# Altium PCB CM5_RP2040_MZM.PcbDoc (part 4 of 5)
Units mil, origin at the board's own origin, x right, y up, seen from the top; angles counter-clockwise.
Board outline 4724.41 x 3543.31 mil, 4 copper layers (Top Layer, GND L2, GND L3, Bottom Layer), stack 62.992 mil thick; 227 components, 122 nets, 905 pads, 3083 vias.
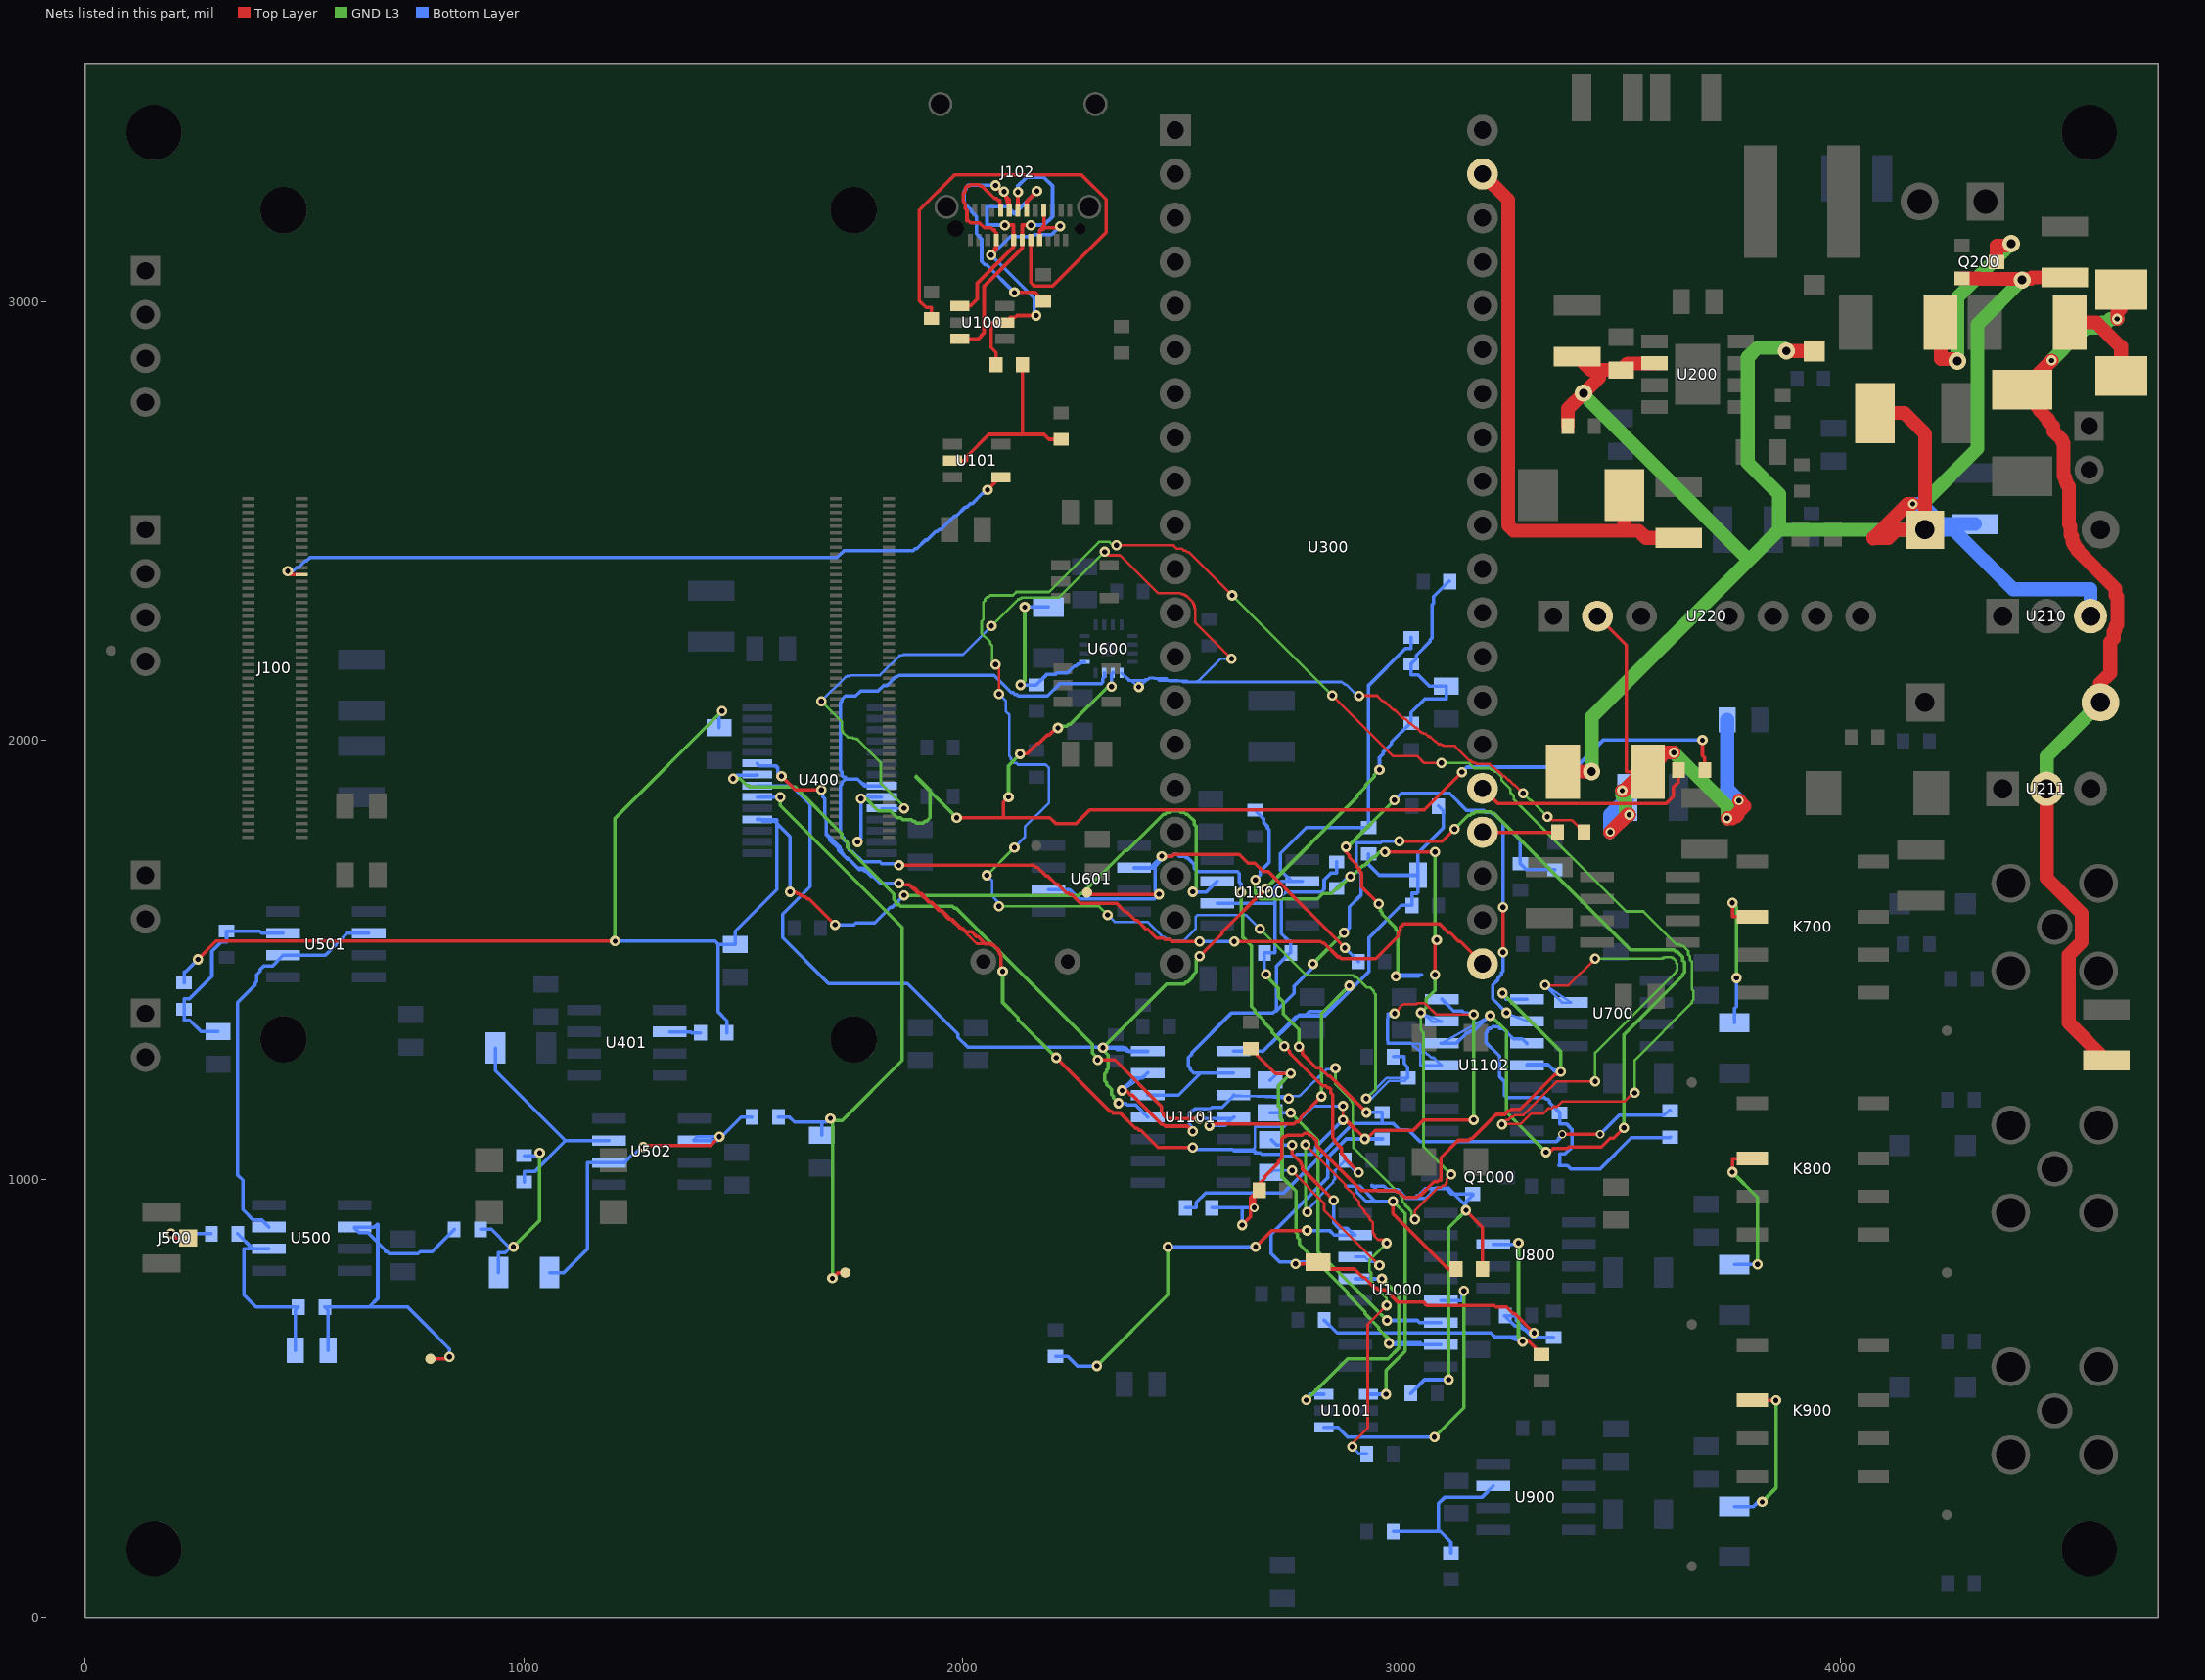
[diagram p6: the nets of this part, all layers, seen from the top]

## Via types
v1: diameter 23.62, hole 11.81, Top Layer to Bottom Layer, tented both sides, 3043 vias
v2: diameter 39.37, hole 19.68, Top Layer to Bottom Layer, tented both sides, 22 vias
v3: diameter 19.68, hole 11.81, Top Layer to Bottom Layer, tented both sides, 14 vias
v4: diameter 21.65, hole 11.81, Top Layer to Bottom Layer, tented both sides, 4 vias

## Nets (pads, with @x,y where several pads share a name; then routed paths per layer and width w, separated by ;. In a path a pad name is that pad's centre, name@x,y a point inside that pad or via, vN(x,y) a via of type N, cw(c..) or ccw(c..) an arc to the next point about the centre after c; other vN are vias at no path point) (continued)
MON_I: C1110.1 R1110.2 R1111.2 R1112.1 U400.7 U1101.4 U1101.7 | length 3396.3
  Top Layer w7.87: v1(2540.35,1508.27) 2591.54,1559.45 2591.54,1563.39 v1(2689.96,1661.81)
  GND L3 w7.87: v1@2319.88,1299.21 2319.88,1295.28 2331.69,1283.46 2331.69,1251.97 2327.76,1248.03 2327.76,1244.09 2323.82,1240.16 2323.82,1224.41 2327.76,1220.47 2327.76,1216.54 2339.57,1204.72 2339.57,1192.91 2343.5,1188.98 2343.5,1185.04 v1(2355.31,1173.23) ; v1(2319.88,1299.61) 2465.55,1445.28 2504.92,1445.28 2508.86,1449.21 2512.8,1449.21 2524.61,1461.02 2524.61,1464.96 2532.48,1472.83 2532.48,1500.39 v1(2540.35,1508.27) ; v1(2689.96,1661.81) 2898.62,1870.47 2898.62,1874.41 2918.31,1894.09 2918.31,1898.03 2937.99,1917.72 2937.99,1921.65 v1(2949.8,1933.46)
  Bottom Layer w7.87: U400.7@1532.17,1896.65 1610.41,1896.65 1652.33,1854.74 1652.33,1666.35 1590.09,1604.11 1590.09,1550.54 1694.38,1446.24 1874.42,1446.24 1989.45,1331.21 1989.45,1323.57 2012.46,1300.56 2365.12,1300.56 2373.95,1291.73 U1101.7@2422.24,1291.73 ; v1@2319.88,1299.21 2347.44,1299.21 2351.38,1295.28 2375,1295.28 2378.94,1291.34 2422.24,1291.34 U1101.7@2422.24,1291.73 ; v1(2319.88,1299.61) 2371.06,1299.61 2378.94,1291.73 U1101.7@2422.24,1291.73 ; v1(2355.31,1173.23) 2371.06,1173.23 2375,1169.29 2394.68,1169.29 U1101.4@2422.24,1141.73 ; v1(2949.8,1933.46) 2949.8,1961.02 2957.68,1968.9 2957.68,1972.83 2977.36,1992.52 2977.36,1996.46 3020.67,2039.76 R1112.1@3022.05,2038.98 3022.05,2063.65 3052.82,2094.42 3101.97,2094.42 C1110.1@3101.97,2124.02 3063.52,2124.02 3037.6,2149.93 3022.05,2149.93 R1111.2@3022.05,2174.61 3033.86,2186.42 3033.86,2194.29 3065.35,2225.79 3065.35,2229.72 3069.29,2233.66 3069.29,2308.46 3073.23,2312.4 3073.23,2328.15 3108.66,2363.58 R1110.2@3109.65,2362.2
MON_PHI: C1112.1 R1118.2 R1119.2 R1120.1 U400.9 U1102.4 U1102.7 | length 6342.4
  Top Layer w5.91: v1(1587.28,1918.7) 1618.78,1887.2 v1(1677.83,1887.2) ; v1(1855,1674.61) 1858.94,1670.67 1878.62,1670.67 1898.31,1650.98 1902.24,1650.98 1921.93,1631.3 1925.87,1631.3 1945.55,1611.61 1949.49,1611.61 1969.17,1591.93 1973.11,1591.93 1992.8,1572.24 1996.73,1572.24 2032.17,1536.81 2067.6,1536.81 2079.41,1525 2079.41,1521.06 2083.35,1517.13 2083.35,1513.19 2087.28,1509.25 2087.28,1477.76 v1(2091.22,1473.82) ; v1(2866.81,1166.73) 2866.81,1143.11 v1@2917.99,1091.93 ; v1@2985.24,1377.36 2993.11,1385.24 2993.11,1387.2 2995.08,1389.17 2995.08,1391.14 3000.98,1397.05 3002.95,1397.05 3004.92,1399.02 3034.45,1399.02 3036.42,1400.98 3052.17,1400.98 3054.13,1399.02 3056.1,1399.02 3079.72,1375.39 v1@3164.37,1375.39
  Top Layer w7.87: v1(1587.28,1918.7) 1618.78,1887.2 v1(1677.83,1887.2) ; v1(1855,1674.61) 1858.94,1670.67 1878.62,1670.67 1886.5,1662.8 1890.43,1662.8 1902.24,1650.98 1906.18,1650.98 1925.87,1631.3 1929.8,1631.3 1949.49,1611.61 1953.43,1611.61 1973.11,1591.93 1977.05,1591.93 1996.73,1572.24 2000.67,1572.24 2008.54,1564.37 2020.35,1564.37 2032.17,1552.56 2036.1,1552.56 2051.85,1536.81 2063.66,1536.81 2067.6,1532.87 2071.54,1532.87 2083.35,1521.06 2083.35,1517.13 2087.28,1513.19 2087.28,1477.76 v1(2091.22,1473.82) ; v1(2213.27,1276.97) 2335.31,1154.92 2339.25,1154.92 2343.19,1150.98 2358.94,1150.98 2394.37,1115.55 2398.31,1115.55 2402.24,1111.61 2406.18,1111.61 2445.55,1072.24 v1(2524.29,1072.24) ; C1112.1@2809.84,811.02 2805.91,807.09 v1(2758.66,807.09) 2794.09,807.09 2801.97,799.21 2809.84,799.21 2813.78,795.28 2892.52,795.28 2912.2,775.59 2916.14,775.59 2939.76,751.97 2943.7,751.97 2947.64,748.03 2963.39,748.03 2990.94,720.47 3050,720.47 3057.87,712.6 3211.42,712.6 3215.35,708.66 3238.98,708.66 3254.72,692.91 3258.66,692.91 v1(3301.97,649.61) ; v1(2866.81,1135.24) 2870.75,1131.3 2874.68,1131.3 2894.37,1111.61 2898.31,1111.61 v1@2917.99,1091.93 ; v1(2916.54,1091.93) 2920.47,1095.87 2924.41,1095.87 2940.16,1111.61 3026.77,1111.61 3050.39,1135.24 v1(3164.57,1135.24)
  GND L3 w5.91: v1@3164.37,1375.39 3164.37,1255.31 3164.57,1255.31
  GND L3 w7.87: v1(2091.22,1473.82) 2091.22,1402.95 2126.65,1367.52 2126.65,1363.58 v1(2213.27,1276.97) ; v1(3164.57,1135.24) v1(3164.57,1375.39) v1@3166.34,1375.39
  Bottom Layer w5.91: U400.9@1532.17,1947.83 1532.17,1946.26 1536.1,1942.32 1575.47,1942.32 1575.47,1938.39 1579.41,1934.45 1579.41,1926.57 v1(1587.28,1918.7) ; v1(1677.83,1887.2) 1677.83,1879.33 1681.77,1875.39 1681.77,1871.46 1685.71,1867.52 1685.71,1824.21 1689.65,1820.28 1689.65,1788.78 1721.14,1757.28 1721.14,1753.35 1725.08,1749.41 1725.08,1745.47 1729.02,1741.54 1729.02,1737.6 1732.95,1733.66 1736.89,1733.66 1760.51,1710.04 1776.26,1710.04 1795.94,1690.35 1799.88,1690.35 1815.63,1674.61 v1(1855,1674.61) ; v1(2524.29,1072.24) 2528.23,1072.24 2532.17,1068.31 2662.09,1068.31 2666.02,1072.24 2666.02,1119.49 2732.95,1119.49 2740.83,1127.36 2756.57,1127.36 2760.51,1131.3 2764.45,1131.3 2799.88,1166.73 v1(2866.81,1166.73) ; v1@2917.99,1091.93 2957.36,1091.93 R1119.2@2955.91,1091.93 ; v1(2984.25,1377.95) 2968.7,1377.95 2968.7,1309.06 3043.31,1309.06 3043.31,1259.84 U1102.4@3091.54,1259.84 3091.54,1259.25 3073.82,1276.97 3067.91,1276.97 3060.04,1284.84 3058.07,1284.84 3054.13,1288.78 3044.29,1288.78 3032.48,1300.59 3030.51,1300.59 3020.67,1310.43 2973.43,1310.43 2967.52,1316.34 2967.52,1365.55 2973.43,1371.46 2979.33,1371.46 v1@2985.24,1377.36
  Bottom Layer w7.87: U400.9@1532.17,1947.83 1532.17,1946.26 1536.1,1942.32 1575.47,1942.32 1575.47,1938.39 1579.41,1938.39 1579.41,1926.57 v1(1587.28,1918.7) ; v1(1677.83,1887.2) 1677.83,1879.33 1681.77,1875.39 1681.77,1871.46 1685.71,1867.52 1685.71,1824.21 1689.65,1820.28 1689.65,1784.84 1697.52,1776.97 1697.52,1773.03 1717.2,1753.35 1717.2,1749.41 1736.89,1729.72 1740.83,1729.72 1764.45,1706.1 1772.32,1706.1 1776.26,1702.17 1780.2,1702.17 1792.01,1690.35 1795.94,1690.35 1811.69,1674.61 v1(1855,1674.61) ; v1(2524.29,1072.24) 2528.23,1072.24 2532.17,1068.31 2614.84,1068.31 2618.78,1064.37 2666.02,1064.37 2666.02,1060.43 2677.83,1060.43 2681.77,1056.5 2725.08,1056.5 2729.02,1052.56 2756.57,1052.56 2760.51,1056.5 2795.94,1056.5 2795.94,1060.43 2799.88,1060.43 2799.88,1064.37 2803.82,1064.37 2803.82,1072.24 v1(2866.81,1135.24) ; v1(2916.54,1091.93) R1119.2@2955.91,1091.93 ; v1@2917.99,1091.93 2957.36,1091.93 R1119.2@2955.91,1091.93 ; U1102.7@3091.54,1409.84 3091.54,1410.83 3119.09,1383.27 3138.78,1383.27 3142.72,1379.33 3150.59,1379.33 3154.53,1375.39 v1@3166.34,1375.39 ; v1(3301.97,649.61) 3290.16,649.61 3282.28,657.48 3278.35,657.48 3274.41,661.42 3270.47,661.42 3266.54,665.35 3258.66,665.35 3235.04,688.98 R1120.1@3236.42,688.98 3261.09,688.98 3261.09,678.04 3299.96,639.17 R1118.2@3346.46,639.17 ; 2809.84,811.02 2722.56,811.02 2702.34,831.24 2702.34,873.8 2831.73,1003.18 2831.73,1049.68 2873.98,1091.93 2928.28,1091.93 R1119.2@2955.91,1091.93 ; 2809.84,811.02 2766.54,811.02 2762.6,807.09 v1(2758.66,807.09) 2809.84,811.02
MON_Q: C1111.1 R1114.2 R1115.2 R1116.1 U400.8 U1101.8 U1101.11 | length 3652.2
  Top Layer w7.87: v1(2307.76,1271.65) 2347.13,1271.65 2453.43,1165.35 2453.43,1153.54 2457.36,1149.61 2457.36,1145.67 2461.3,1141.73 2465.24,1141.73 2469.17,1137.8 v1(2540.04,1137.8) ; v1(2562.01,1122.05) 2565.94,1125.98 2754.92,1125.98 ; 2660.43,1125.98 2754.92,1125.98 ; 2754.92,1125.98 2758.86,1129.92 ; 2754.92,1125.98 2758.86,1129.92 ; 2758.86,1129.92 2762.8,1129.92 ; 2758.86,1129.92 2762.8,1129.92 ; 2762.8,1129.92 2770.67,1137.8 ; 2762.8,1129.92 2770.67,1137.8 ; 2770.67,1137.8 2770.67,1141.73 ; 2770.67,1137.8 2770.67,1141.73 ; 2770.67,1141.73 v1(2817.91,1188.98) 2770.67,1141.73
  GND L3 w7.87: v1(1477.05,1913.39) 1492.8,1913.39 1508.54,1897.64 1512.48,1897.64 1516.42,1893.7 1618.78,1893.7 1725.08,1787.4 1725.08,1779.53 1736.89,1767.72 1736.89,1755.91 1843.19,1649.61 1843.19,1637.8 1847.13,1633.86 1847.13,1629.92 1851.06,1625.98 1855,1625.98 1858.94,1622.05 1977.05,1622.05 1980.98,1618.11 1984.92,1618.11 2295.94,1307.09 2295.94,1287.4 2307.76,1275.59 v1(2307.76,1271.65) ; v1(2817.91,1188.98) 2817.91,1377.95 v1(2880.91,1440.94)
  Bottom Layer w7.87: v1(1477.05,1913.39) 1484.92,1921.26 1532.17,1921.26 U400.8@1532.17,1922.24 ; v1(2540.04,1137.8) 2614.84,1137.8 2618.78,1141.73 U1101.11@2617.13,1141.73 2597.44,1122.05 v1(2562.01,1122.05) ; U1101.8@2617.13,1291.73 2683.87,1291.73 ; v1(2880.91,1440.94) 2853.35,1413.39 2853.35,1405.51 2829.72,1381.89 2790.35,1381.89 2782.48,1374.02 2766.73,1374.02 2762.8,1370.08 2758.86,1370.08 2715.55,1326.77 2715.55,1322.83 2684.06,1291.34 2683.87,1291.73 ; R1115.2@2925.2,1741.54 2925.2,1716.86 2949.15,1692.91 C1111.1@3037.8,1692.91 ; R1114.2@3084.45,1850.39 3095.19,1839.65 3095.19,1800.95 3037.8,1743.56 C1111.1@3037.8,1692.91 ; 2683.87,1291.73 2765.04,1372.91 2825.17,1372.91 2926.37,1474.11 2926.37,1550.85 2999.54,1624.02 R1116.1@3024.21,1624.02 3024.21,1651.64 3034.98,1651.64 3037.8,1654.46 C1111.1@3037.8,1692.91
N15_FUSED: D202.1 F201.2 | length 207.1
  Top Layer w31.5: F201.2@4522.44,2952.76 4582.74,2952.76 4637.8,2897.7 4639.76,2897.7 D202.1@4639.76,2830.71
NONINV_I: R702.2 R703.1 U700.3 | length 6293.3
  Top Layer w5.91: v1(2074.8,2173.23) 2082.68,2165.35 v1(2082.68,2106.3) ; v1(2350.39,2444.88) 2480.31,2444.88 2488.19,2437.01 2500,2437.01 2503.94,2433.07 2507.87,2433.07 2511.81,2429.13 2515.75,2429.13 v1(2614.17,2330.71) ; v1(2842.52,2102.36) 2980.31,1964.57 3035.43,1964.57 3051.18,1948.82 v1(3090.55,1948.82) ; v1@3327.17,1441.54 3380.31,1441.54 v1(3441.34,1502.56) ; v1(3441.34,1223.03) 3354.72,1223.03 3277.95,1146.26 3258.27,1146.26 3254.33,1142.32 3250.39,1142.32 3242.52,1134.45 3238.58,1134.45 v1(3228.74,1124.61) 3228.35,1125.98 3271.65,1125.98 3295.28,1149.61 3322.83,1149.61 3334.65,1161.42 3342.52,1161.42 3346.46,1165.35 3354.33,1165.35 3366.14,1177.17 3507.87,1177.17 3527.56,1196.85 v1(3531.5,1196.85)
  GND L3 w5.91: v1(2055.12,1692.91) v1(2118.11,1755.91) ; v1(2074.8,2173.23) 2066.93,2181.1 2066.93,2216.54 2062.99,2220.47 2062.99,2224.41 2043.31,2244.09 2043.31,2271.65 2047.24,2275.59 2047.24,2314.96 2051.18,2318.9 2051.18,2322.83 2055.12,2326.77 2059.06,2326.77 2062.99,2330.71 2114.17,2330.71 2122.05,2338.58 2196.85,2338.58 2311.02,2452.76 2334.65,2452.76 2342.52,2444.88 v1(2350.39,2444.88) ; v1(2082.68,1622.05) 2311.02,1622.05 v1(2330.71,1602.36) ; v1(2614.17,2330.71) v1(2842.52,2102.36) ; v1(2677.17,1570.87) 2783.46,1464.57 2889.76,1464.57 2893.7,1460.63 2897.64,1460.63 2921.26,1437.01 2929.13,1437.01 2937.01,1429.13 2937.01,1425.2 2940.94,1421.26 2940.94,1204.72 v1@2921.26,1185.04 ; v1(3090.55,1948.82) 3153.54,1948.82 3165.35,1937.01 3200.79,1937.01 3204.72,1933.07 3208.66,1933.07 3212.6,1929.13 3216.54,1929.13 3228.35,1917.32 3228.35,1909.45 3248.03,1889.76 3248.03,1881.89 3255.91,1874.02 3255.91,1866.14 3511.81,1610.24 3551.18,1610.24 3625.98,1535.43 3633.86,1535.43 3637.8,1531.5 3641.73,1531.5 3653.54,1519.68 3653.54,1511.81 3657.48,1507.87 3657.48,1500 3661.42,1496.06 3661.42,1433.07 3665.35,1429.13 3665.35,1409.45 3661.42,1405.51 3661.42,1401.57 3531.5,1271.65 v1(3531.5,1196.85) ; v1(3441.34,1223.03) 3441.34,1287.99 3626.38,1473.03 3626.38,1475 3628.35,1476.97 3628.35,1490.75 3626.38,1492.72 3626.38,1496.65 3618.5,1504.53 3616.54,1504.53 3614.57,1506.5 3600.79,1506.5 3598.82,1504.53 3594.88,1504.53 3592.91,1502.56 v1(3441.34,1502.56)
  Bottom Layer w5.91: v1(2055.12,1692.91) 2066.93,1681.1 2066.93,1645.67 2082.68,1629.92 v1(2082.68,1622.05) ; v1(2082.68,2106.3) 2098.43,2090.55 2098.43,2066.93 2106.3,2059.06 2106.3,1964.57 2110.24,1960.63 2110.24,1956.69 2118.11,1948.82 2122.05,1948.82 2125.98,1944.88 2188.98,1944.88 2196.85,1937.01 2196.85,1858.27 2141.73,1803.15 2141.73,1779.53 v1(2118.11,1755.91) ; v1(2330.71,1602.36) 2346.46,1586.61 2421.26,1586.61 2456.69,1551.18 2460.63,1551.18 2464.57,1547.24 2472.44,1547.24 2476.38,1543.31 2503.94,1543.31 2531.5,1570.87 2531.5,1598.43 2535.43,1602.36 2645.67,1602.36 v1(2677.17,1570.87) ; v1(2919.68,1183.66) 2966.93,1230.91 R703.1@3014.17,1230.91 3015.75,1232.28 3007.87,1224.41 2972.44,1224.41 2933.07,1185.04 v1@2921.26,1185.04 ; v1(3326.97,1442.32) U700.3@3386.02,1402.95 3386.22,1402.17 3366.54,1402.17 v1@3327.17,1441.54
  Bottom Layer w7.87: R702.2@2981.3,1279.53 3005.97,1279.53 3005.97,1263.78 3014.17,1255.58 R703.1@3014.17,1230.91
NONINV_PHI: R902.2 R903.1 U900.3 | length 371.1
  Bottom Layer w7.87: R902.2@2981.3,196.85 3083.78,196.85 ; R903.1@3112.6,148.23 3112.6,172.9 3088.65,196.85 3083.78,196.85 ; U900.3@3208.86,300.59 3183.86,275.59 3099.11,275.59 3083.78,260.27 3083.78,196.85
NONINV_Q: R802.2 R803.1 U800.3 | length 854.4
  Top Layer w7.87: v1(3276.17,630.13) 3290.14,630.13 R803.1@3319.29,600.98
  GND L3 w7.87: v1(3266.47,855.23) 3266.47,639.83 v1(3276.17,630.13)
  Bottom Layer w7.87: R802.2@2823.82,679.13 2853.35,649.61 3203.67,649.61 3212.93,640.35 3240.55,640.35 ; U800.3@3208.86,851.77 3257.15,851.77 3260.61,855.23 v1(3266.47,855.23) ; 3240.55,640.35 3268.18,640.35 3268.18,638.13 v1(3276.17,630.13) 3240.55,640.35
P15_FUSED: F200.2 Q200.3 | length 514.5
  Top Layer w31.5: F200.2@4228.54,2952.76 4228.54,2869.03 4262.37,2869.03 v2(4266.73,2864.67) ; Q200.3@4355.91,3090.55 4355.91,3128.02 4384.99,3128.02 v2(4389.21,3132.24)
  GND L3 w31.5: v2(4266.73,2864.67) 4266.73,3009.76 v2(4389.21,3132.24)
PD_K: C500.1 R500.1 R506.2 U500.2 | length 484.2
  Bottom Layer w7.87: R506.2@348.23,875.98 383.07,841.14 U500.2@419.09,841.14 362.2,841.14 362.2,736.22 389.76,708.66 R500.1@486.42,708.66 479.13,701.38 C500.1@479.13,610.24
PD_RAW: J500.1 R506.1 | length 135.6
  Top Layer w7.87: v1(196.16,875.98) 196.16,874.24 204.26,866.14 J500.1@234.84,866.14
  Bottom Layer w7.87: v1(196.16,875.98) R506.1@287.99,875.98
PHOTO_ADC: C507.1 R505.2 TP501.1 U400.6 | length 1540.1
  Top Layer w7.87: v1(1703.31,774.26) 1716.46,787.4 TP501.1@1732.28,787.4
  GND L3 w7.87: v1(1584.56,1871.06) 1584.56,1851.54 1862.14,1573.96 1862.14,1270.62 1725.56,1134.04 v1@1703.31,1134.04 ; v1(1698.74,1138.61) v1@1703.31,1134.04 ; v1(1703.31,774.26) v1@1703.31,1134.04
  Bottom Layer w7.87: U400.6@1532.17,1871.06 v1(1584.56,1871.06) ; R505.2@1580.53,1141.73 1605.2,1141.73 1616.95,1129.99 1678.74,1129.99 ; C507.1@1678.74,1100.39 1678.74,1129.99 ; v1(1698.74,1138.61) 1690.13,1129.99 1678.74,1129.99
PICO_VSYS: C300.1 D300.1 U300.39 | length 1306.1
  Top Layer w31.5: U300.39@3184.65,3290.94 3242.96,3232.63 3242.96,2490.82 3255.5,2478.28 3507.97,2478.28 ; D300.1@3507.97,2559.05 3507.97,2478.28 ; C300.1@3631.89,2461.61 3557.02,2461.61 3540.35,2478.28 3507.97,2478.28
RAIL_NEG: R1008.2 R1009.2 U1102.10 | length 876.2
  Bottom Layer w7.87: U1102.10@3286.42,1309.84 3286.42,1308.46 3274.61,1320.28 3254.92,1320.28 3231.3,1343.9 3223.43,1343.9 3223.43,1347.83 3207.68,1347.83 3203.74,1343.9 3199.8,1343.9 3195.87,1339.96 3195.87,1336.02 3191.93,1332.09 3191.93,1312.4 3223.43,1280.91 3223.43,1233.66 3235.24,1221.85 3235.24,1190.35 3239.17,1186.42 3325.79,1186.42 3329.72,1182.48 3333.66,1182.48 3337.6,1178.54 3337.6,1174.61 3361.22,1150.98 R1008.2@3360.24,1150.98 3360.24,1126.31 3375.66,1126.31 3389.09,1112.87 3389.09,1074.07 3372.57,1057.55 3360.24,1057.55 3360.24,1032.87 3358.27,1031.5 3377.95,1031.5 3385.83,1023.62 3452.76,1023.62 3523.62,1094.49 3610.24,1094.49 R1009.2@3612.2,1095.87
RAIL_POS: R1006.2 R1007.1 U1102.9 | length 1605.9
  Top Layer w7.87: v1(2873.3,1757.48) 2873.3,1745.67 2881.17,1737.8 2881.17,1733.86 2896.92,1718.11 2896.92,1714.17 2904.79,1706.3 2904.79,1702.36 2908.73,1698.43 2908.73,1666.93 v1(2948.1,1627.56) ; v1(3231.56,1517.32) v1(3231.56,1619.68)
  GND L3 w7.87: v1(2873.3,1757.48) 2877.23,1757.48 v1(2983.53,1863.78) ; v1(2948.1,1627.56) 2948.1,1619.68 2952.04,1615.75 2952.04,1611.81 2955.97,1607.87 2955.97,1603.94 2987.47,1572.44 2987.47,1568.5 2991.41,1564.57 2991.41,1466.14 v1(2987.47,1462.2)
  Bottom Layer w5.91: v1(3239.17,1379.53) U1102.9@3286.42,1359.84
  Bottom Layer w7.87: v1(2983.53,1863.78) 2999.28,1879.53 3109.52,1879.53 3148.89,1840.16 3188.26,1840.16 3192.19,1836.22 3204,1836.22 3207.94,1832.28 3211.88,1832.28 3231.56,1812.6 ; v1(2987.47,1462.2) 3038.65,1462.2 3042.59,1466.14 3046.52,1466.14 3046.52,1465.94 3018.9,1465.94 2991.27,1465.94 2991.27,1464.17 v1@2988.39,1461.29 ; v1(3231.56,1517.32) 3231.56,1474.02 3227.63,1470.08 3227.63,1466.14 3219.75,1458.27 3219.75,1454.33 3207.94,1442.52 3207.94,1411.02 3239.44,1379.53 v1(3239.17,1379.53) ; v1(3231.56,1619.68) 3231.56,1812.6 ; R1006.2@3349.61,1705.31 3284.65,1705.31 R1007.1@3270.87,1719.09 3270.87,1773.3 3231.56,1812.6
REF_ADC: C400.1 C401.1 R400.2 R501.1 U400.4 U1100.3 | length 4075.8
  Top Layer w7.87: v1(257.44,1501.2) 298.8,1542.56 v1(1208.03,1542.56) ; v1(1606.97,1654.92) 1618.78,1654.92 1622.72,1650.98 1626.65,1650.98 1630.59,1647.05 1634.53,1647.05 1638.46,1643.11 1642.4,1643.11 1646.34,1639.17 1650.28,1639.17 v1(1709.33,1580.12)
  GND L3 w7.87: v1(1208.03,1542.56) 1208.03,1822.98 v1(1452.11,2067.06) ; v1(1866.81,1647.05) 2264.45,1647.05 2268.39,1650.98 2272.32,1650.98 2370.75,1749.41 2374.68,1749.41 2457.36,1832.09 2461.3,1832.09 2465.24,1836.02 2473.11,1836.02 2477.05,1839.96 2492.8,1839.96 2496.73,1836.02 2504.61,1836.02 2508.54,1832.09 2512.48,1832.09 2528.23,1816.34 2528.23,1808.46 2532.17,1804.53 2532.17,1662.8 v1(2524.29,1654.92)
  Bottom Layer w7.87: R501.1@225.98,1447.44 225.98,1472.11 228.35,1472.11 v1(257.44,1501.2) ; v1(1208.03,1542.56) 1436.23,1542.56 1443.36,1535.43 ; C401.1@1445.45,2029.13 1445.45,2060.41 v1(1452.11,2067.06) ; R400.2@1463.15,1333.46 1463.15,1361.09 1443.36,1380.88 1443.36,1535.43 ; v1(1606.97,1654.92) 1606.97,1780.91 1571.54,1816.34 1543.98,1816.34 1540.04,1820.28 1532.17,1820.28 U400.4@1532.17,1819.88 1576.52,1819.88 1576.52,1659.74 1481.81,1565.03 C400.1@1481.81,1535.43 1443.36,1535.43 ; v1(1709.33,1580.12) 1752.64,1580.12 1756.57,1584.06 1799.88,1584.06 1835.31,1619.49 1839.25,1619.49 v1(1866.81,1647.05) ; v1(2524.29,1654.92) 2555.79,1654.92 2579.41,1678.54 U1100.3@2579.72,1678.54
REF_ADC_RAW: R400.1 U401.6 | length 71.7
  Bottom Layer w7.87: U401.6@1332.28,1336.02 1380.58,1336.02 1383.14,1333.46 R400.1@1402.91,1333.46
REF_BUF: R1009.1 R1100.1 R1103.1 R1111.1 R1115.1 R1119.1 U1100.2 U1100.6 | length 2924.8
  Top Layer w7.87: v1(2766.34,1301.77) 2774.21,1293.9 2774.21,1286.02 2805.71,1254.53 2813.58,1254.53 2833.27,1234.84 2837.2,1234.84 v1(2919.88,1152.17) ; v3(3366.14,1102.36) v3(3452.76,1102.36)
  GND L3 w7.87: v1(2691.54,1467.13) 2699.41,1459.25 2699.41,1455.31 2719.09,1435.63 2719.09,1415.94 2730.91,1404.13 2730.91,1376.57 2766.34,1341.14 v1(2766.34,1301.77)
  Bottom Layer w7.87: R1103.1@2507.68,935.04 2532.35,935.04 2532.35,947.38 2553.92,968.95 2731.42,968.95 2889.96,1127.49 2955.91,1127.49 ; U1100.2@2579.72,1628.54 2628.02,1628.54 2712.27,1628.54 ; v1(2691.54,1467.13) 2687.6,1471.06 2687.6,1514.37 R1100.1@2687.6,1515.75 2712.27,1515.75 2712.27,1628.54 ; U1100.6@2774.61,1678.54 U1100.6@2750.46,1678.54 ; v1(2919.88,1152.17) 2955.31,1152.17 R1119.1@2955.91,1152.17 2955.91,1127.49 ; R1111.1@3022.05,2234.84 3022.05,2210.17 3009.71,2210.17 2925.2,2125.65 R1115.1@2925.2,1801.77 2783.29,1801.77 2724.17,1742.65 2724.17,1704.84 U1100.6@2750.46,1678.54 ; v3(3366.14,1102.36) 3358.27,1094.49 3360.24,1093.11 3353.33,1086.2 3041.83,1086.2 3015.74,1112.29 2995.78,1112.29 2980.58,1127.49 2955.91,1127.49 ; v3(3452.76,1102.36) 3496.06,1145.67 3598.43,1145.67 3610.24,1157.48 R1009.1@3612.2,1156.1 ; 2712.27,1628.54 2712.27,1664.5 2726.31,1678.54 U1100.6@2750.46,1678.54
REF_DAC: C603.1 R602.1 U600.1 | length 404.3
  GND L3 w7.87: v1(2131.85,2126.57) 2141.44,2136.17 v1(2141.44,2304.13)
  Bottom Layer w7.87: v1(2131.85,2126.57) 2140.21,2126.57 R602.1@2167.83,2126.57 2191.46,2150.2 2211.14,2150.2 2215.08,2154.13 2238.7,2154.13 2254.45,2169.88 2258.39,2169.88 2262.32,2173.82 2266.26,2173.82 2270.2,2177.76 2278.07,2177.76 U600.1@2277.36,2179.13 ; v1(2141.44,2304.13) C603.1@2195.28,2304.13
RELAY_EN: R1002.1 U1001.4 | length 986.6
  Top Layer w7.87: v1(2980.63,949.76) 2980.32,944.88 2980.32,921.26 3106.3,795.28 R1002.1@3124.21,795.28
  GND L3 w7.87: v1(2964.65,509.84) 2964.65,564.39 3008.36,608.09 3008.36,922.03 v1(2980.63,949.76)
  Bottom Layer w7.87: U1001.4@2925.2,509.84 2956.76,509.84 v1(2964.65,509.84) ; 2872.24,984.25 2896.92,984.25 2896.92,971.91 2919.07,949.76 v1(2980.63,949.76) 2976.38,948.82 2940.94,948.82 2905.51,984.25 2872.24,984.25
RELAY_GATE: Q1000.1 R1002.2 R1003.1 | length 1214.6
  Top Layer w7.87: v1(3147.05,929.13) 3149.61,925.2 3185.04,889.76 3185.04,795.28 R1002.2@3184.45,795.28
  GND L3 w7.87: v1(3107.68,543.31) 3107.68,889.76 v1(3147.05,929.13)
  Bottom Layer w7.87: R1003.1@3021.06,511.81 3052.56,543.31 v1(3107.68,543.31) ; 2932.48,984.25 2932.48,986.22 2944.29,974.41 2987.6,974.41 2991.53,970.47 2995.47,970.47 3007.28,958.66 3030.91,958.66 3034.84,962.6 3038.78,962.6 3054.53,978.35 3101.77,978.35 3113.58,966.53 3160.83,966.53 Q1000.1@3162.2,966.54 3162.8,964.57 3147.05,948.82 v1(3147.05,929.13) 3145.67,933.07 3145.67,940.94 3106.3,980.32 3078.74,980.32 3055.12,956.69 3011.81,956.69 2992.13,976.38 2968.5,976.38 2960.63,984.25 2932.48,984.25
SAFE_R_I: K700.2 R705.1 | length 355.6
  Top Layer w7.87: v1(3753.87,1629.78) 3753.87,1598.43 K700.2@3799.21,1598.43
  GND L3 w7.87: v1(3753.87,1629.78) 3763.19,1620.45 v1(3763.19,1458.83)
  Bottom Layer w7.87: R705.1@3758.27,1356.79 3758.27,1388.85 3763.19,1393.77 v1(3763.19,1458.83)
SAFE_R_PHI: K900.2 R905.1 | length 366.1
  Top Layer w7.87: K900.2@3799.21,496.06 v1(3853.12,496.06)
  GND L3 w7.87: v1(3821.85,264.65) 3853.12,295.92 v1(3853.12,496.06)
  Bottom Layer w7.87: R905.1@3758.27,254.43 3802.63,254.43 3812.85,264.65 v1(3821.85,264.65)
SAFE_R_Q: K800.2 R805.1 | length 363.4
  Top Layer w7.87: v1(3753.87,1016.13) 3753.87,1047.24 K800.2@3799.21,1047.24
  GND L3 w7.87: v1(3753.87,1016.13) 3811.04,958.96 v1(3811.04,805.61)
  Bottom Layer w7.87: R805.1@3758.27,805.61 3802.63,805.61 v1(3811.04,805.61)
SK_A: C504.1 R503.2 R504.1 | length 446.8
  GND L3 w7.87: v1(976.37,846.32) 1036.34,906.29 v1(1036.34,1059.83)
  Bottom Layer w7.87: R503.2@901.77,885.83 926.44,885.83 965.95,846.32 v1@971.16,846.32 ; C504.1@942.72,787.4 942.72,832.74 957.59,832.74 v1@971.16,846.32 ; v1(976.37,846.32) v1@971.16,846.32 ; R504.1@1000.79,1053.74 1028.41,1053.74 1030.25,1053.74 v1(1036.34,1059.83)
SK_B: C505.1 R504.2 U502.3 | length 524
  Bottom Layer w7.87: C505.1@935.63,1299.21 935.63,1247.64 1095.28,1087.99 ; R504.2@1000.79,993.5 1000.79,1018.18 1025.46,1018.18 1095.28,1087.99 ; U502.3@1193.9,1087.99 1095.28,1087.99
SK_OUT: C504.2 R505.1 U502.2 U502.6 | length 848.7
  Top Layer w7.87: v1(1272.64,1073.43) 1276.57,1077.36 1426.18,1077.36 v1(1445.87,1097.05)
  Bottom Layer w7.87: C504.2@1058.86,787.4 1091.41,787.4 1145.6,841.6 1145.6,1037.99 U502.2@1193.9,1037.99 1229.33,1037.99 1249.02,1057.68 1252.95,1057.68 1260.83,1065.55 1264.76,1065.55 v1(1272.64,1073.43) ; v1(1445.87,1097.05) 1394.68,1097.05 1386.81,1089.17 U502.6@1388.78,1087.99 1441.88,1087.99 1495.62,1141.73 R505.1@1520.3,1141.73
SPI_MISO: U300.21 U400.22 U600.15 | length 2841.3
  Top Layer w7.87: v1(1855,1715.35) 2162.09,1715.35 2166.02,1711.42 2169.96,1711.42 2189.65,1691.73 2193.58,1691.73 2213.27,1672.05 2217.2,1672.05 2236.89,1652.36 2240.83,1652.36 2244.76,1648.43 2248.7,1648.43 2268.39,1628.74 2351.06,1628.74 2370.75,1609.06 2374.68,1609.06 2394.37,1589.37 2398.31,1589.37 2417.99,1569.68 2421.93,1569.68 2441.61,1550 2457.36,1550 2461.3,1546.06 2473.11,1546.06 2477.05,1542.13 v1(2540.04,1542.13) ; v1(2618.78,1542.13) 2815.63,1542.13 2819.57,1538.19 2823.5,1538.19 2855,1506.69 2858.94,1506.69 2862.87,1502.76 2941.61,1502.76 2992.8,1553.94 2992.8,1561.81 2996.73,1565.75 2996.73,1573.62 3004.61,1581.5 3087.28,1581.5 3106.97,1561.81 3110.91,1561.81 3130.59,1542.13 3134.53,1542.13 3185.71,1490.94 U300.21@3184.65,1490.94
  Bottom Layer w7.87: v1(1855,1715.35) 1851.06,1719.29 1815.63,1719.29 1811.69,1723.23 1772.32,1723.23 1748.7,1746.85 1744.76,1746.85 1740.83,1750.79 1740.83,1754.72 1736.89,1758.66 1736.89,1766.54 1729.02,1774.41 1729.02,1778.35 1725.08,1782.28 1725.08,1786.22 1721.14,1790.16 1721.14,1896.46 1725.08,1900.39 1725.08,1904.33 1732.95,1912.2 1760.51,1912.2 1776.26,1896.46 1815.63,1896.46 U400.22@1815.63,1896.65 1780.2,1896.65 1776.26,1900.59 1772.32,1900.59 1760.51,1912.4 1736.89,1912.4 1732.95,1916.34 1729.02,1916.34 1725.08,1920.28 1725.08,1928.15 1721.14,1932.09 1721.14,2085.63 1725.08,2089.57 1725.08,2093.5 1732.95,2101.38 1756.57,2101.38 1768.39,2113.19 1807.76,2113.19 1819.57,2125 1827.44,2125 1847.13,2144.68 1851.06,2144.68 1855,2148.62 2071.54,2148.62 2110.91,2109.25 2114.84,2109.25 2118.78,2105.31 2122.72,2105.31 2126.65,2101.38 2193.58,2101.38 2221.14,2128.94 2315.63,2128.94 2319.57,2132.87 2319.57,2140.75 2323.5,2144.68 2323.5,2152.56 U600.15@2322.64,2153.54 ; v1(2540.04,1542.13) v1(2618.78,1542.13)
SPI_MOSI: R301.2 U400.23 U600.14 | length 2944.7
  Top Layer w7.87: v1(1986.35,1823.93) 2199.24,1823.93 2212.22,1810.96 2259.15,1810.96 2289.88,1841.68 3051.54,1841.68 v1(3137.83,1927.98) ; 2092.79,1823.93 2092.79,1859.37 v1(2104.6,1871.18) ; v1@2132.16,1969.6 v1(2130.59,1969.49) 2146.34,1969.49 2169.96,1993.11 2173.9,1993.11 2193.58,2012.8 2197.52,2012.8 2213.27,2028.54 v1(2217.2,2028.54) ; v1(3685.72,2000.78) 3685.72,1965.82 3691.24,1960.3 R301.2@3691.24,1932.68
  GND L3 w7.87: v1(1768.39,1867.13) 1780.2,1867.13 1807.76,1839.57 1835.31,1839.57 1851.06,1823.82 1858.94,1823.82 1862.87,1819.88 1882.56,1819.88 1886.5,1815.94 1890.43,1815.94 1894.37,1812.01 1910.12,1812.01 1914.06,1815.94 1917.99,1815.94 1925.87,1823.82 1925.87,1886.81 1894.37,1918.31 1893.44,1916.83 v1(1986.35,1823.93) ; v1(2104.6,1871.18) 2104.6,1942.04 v1@2132.16,1969.6 ; v1(2217.2,2028.54) 2221.14,2032.48 2236.89,2032.48 2240.83,2036.42 2244.76,2036.42 2331.38,2123.03 v1(2339.25,2123.03)
  Bottom Layer w7.87: v1(1760.51,1768.7) 1768.39,1776.57 1768.39,1859.25 1780.2,1871.06 U400.23@1815.63,1871.06 1772.32,1871.06 v1(1768.39,1867.13) ; v1(2339.25,2123.03) 2339.25,2150.59 2343.19,2154.53 U600.14@2342.32,2153.54 ; v1(3137.83,1927.98) 3149.16,1939.31 3397.95,1939.31 3459.42,2000.78 v1(3685.72,2000.78)
SPI_MOSI_RAW: R301.1 U300.25 | length 520.6
  Top Layer w7.87: U300.25@3184.65,1890.94 3218.92,1856.67 3603.68,1856.67 3619.58,1872.57 3619.58,1893.63 3631,1905.05 R301.1@3631,1932.68
SPI_SCLK: R300.2 U400.24 U600.13 | length 3090.1
  Top Layer w5.91: v1(2323.5,2430.12) 2331.38,2422.24 2356.97,2422.24 2358.94,2420.28 2360.91,2420.28 2445.55,2335.63 2496.73,2335.63 2498.7,2333.66 2502.64,2333.66 2504.61,2331.69 2506.57,2331.69 2508.54,2329.72 2510.51,2329.72 2524.29,2315.94 2524.29,2313.98 2526.26,2312.01 2526.26,2310.04 2528.23,2308.07 2528.23,2302.17 2530.2,2300.2 2530.2,2268.7 v1(2612.87,2186.02) ; v1(2903.35,2101.97) 2944.68,2101.97 2956.5,2090.16 2958.46,2090.16 2960.43,2088.19 2962.4,2088.19 2980.12,2070.47 2982.09,2070.47 2984.06,2068.5 2986.02,2068.5 3003.74,2050.79 3005.71,2050.79 3007.68,2048.82 3009.65,2048.82 3019.49,2038.98 3021.46,2038.98 3031.3,2029.13 3033.27,2029.13 3043.11,2019.29 3045.08,2019.29 3047.05,2017.32 3049.02,2017.32 3050.98,2015.35 3054.92,2015.35 3060.83,2009.45 3062.8,2009.45 3064.76,2007.48 3066.73,2007.48 3076.57,1997.64 3078.54,1997.64 3084.45,1991.73 3088.39,1991.73 3090.35,1989.76 3094.29,1989.76 3096.26,1987.8 3121.85,1987.8 3155.31,1954.33 3157.28,1954.33 3161.22,1950.39 3163.19,1950.39 3165.16,1948.43 3169.09,1948.43 3171.06,1946.46 3200.59,1946.46 3208.46,1938.58 3210.43,1938.58 3220.28,1928.74 3222.24,1928.74 3232.09,1918.9 3234.06,1918.9 3243.9,1909.06 3245.87,1909.06 3255.71,1899.21 3257.68,1899.21 v1(3277.36,1879.53) ; v1(3332.48,1826.38) 3340.35,1818.5 3387.6,1818.5 3415.16,1790.94 R300.2@3415.65,1790.94
  GND L3 w5.91: v1(1677.83,2089.57) 1725.08,2042.32 1725.08,2022.64 1727.05,2020.67 1727.05,2018.7 1738.86,2006.89 1748.7,2006.89 1750.67,2004.92 1756.57,2004.92 1758.54,2002.95 1760.51,2002.95 1813.66,1949.8 1813.66,1902.56 1860.91,1855.31 1860.91,1851.38 v1(1866.81,1845.47) ; v1(2065.63,2260.83) 2126.65,2321.85 2128.62,2321.85 2130.59,2323.82 2132.56,2323.82 2134.53,2325.79 2219.17,2325.79 v1(2323.5,2430.12) ; v1(3277.36,1879.53) 3293.11,1863.78 3295.08,1863.78 v1(3332.48,1826.38)
  Bottom Layer w5.91: v1(1677.83,2089.57) 1732.95,2144.68 1734.92,2144.68 1736.89,2146.65 1742.8,2146.65 1744.76,2148.62 1811.69,2148.62 1856.97,2193.9 1862.87,2193.9 1864.84,2195.87 2000.67,2195.87 v1(2065.63,2260.83) ; U400.24@1815.63,1845.47 v1(1866.81,1845.47) ; v1(2612.87,2186.02) 2587.28,2186.02 2536.1,2134.84 2534.13,2134.84 2532.17,2132.87 2502.64,2132.87 2500.67,2134.84 2492.8,2134.84 2490.83,2136.81 2447.52,2136.81 2443.58,2140.75 2437.68,2140.75 2435.71,2142.72 2425.87,2142.72 2421.93,2138.78 2416.02,2138.78 2414.06,2136.81 2378.62,2136.81 2362.87,2152.56 U600.13@2362.01,2153.54 v1(2401.38,2122.05) 2401.38,2121.65 2407.28,2127.56 2409.25,2127.56 2421.06,2139.37 2423.03,2139.37 2425,2141.34 2464.37,2141.34 2470.28,2135.43 2511.61,2135.43 2513.58,2133.46 2863.98,2133.46 2867.91,2129.53 2869.88,2129.53 2871.85,2127.56 2873.82,2127.56 2891.54,2109.84 2893.5,2109.84 2895.47,2107.87 2897.44,2107.87 v1(2903.35,2101.97)
SPI_SCLK_RAW: R300.1 U300.24 | length 170.8
  Top Layer w7.87: U300.24@3184.65,1790.94 R300.1@3355.41,1790.94
TIA_OUT: C500.2 R500.2 R503.1 TP500.1 U500.6 | length 1021.8
  Top Layer w7.87: TP500.1@787.4,590.55 826.18,590.55 v1(830.8,595.17)
  Bottom Layer w7.87: C500.2@553.94,610.24 553.94,701.38 R500.2@546.65,708.66 647.64,708.66 ; v1(830.8,595.17) 830.8,613.3 774.8,669.29 735.43,708.66 647.64,708.66 ; R503.1@841.54,885.83 842.32,885.83 791.14,834.65 763.58,834.65 759.65,830.71 692.72,830.71 688.78,834.65 684.84,834.65 684.84,838.58 645.47,877.95 625.79,877.95 613.98,889.76 U500.6@613.98,891.14 659.45,891.14 665.94,897.64 667.32,897.64 667.32,728.35 647.64,708.66
USB_CC1: J102.A5 R100.1 | length 1144.4
  Top Layer w7.87: R100.1@1929.13,2962.01 1929.13,2986.68 1916.8,2986.68 1901.41,3002.07 1901.41,3208.56 1981.43,3288.59 2271.64,3288.59 2327.05,3233.18 2327.05,3158.11 2205.31,3036.37 2162.62,3036.37 2155.51,3043.48 J102.A5@2155.51,3140.94
USB_CC2: J102.B5 R101.1 | length 554.8
  Top Layer w5.91: v1(2094.49,3251.18) J102.B5@2106.3,3207.87
  Top Layer w7.87: v1(2074.8,3265.16) 2106.3,3233.66 2106.3,3206.1 J102.B5@2106.3,3207.87 ; v1(2118.11,3021.06) 2165.35,3021.06 2185.04,3001.38 R101.1@2184.05,3001.38
  Bottom Layer w7.87: v1(2074.8,3265.16) 2011.81,3265.16 2007.87,3261.22 2007.87,3257.28 2003.94,3253.35 2003.94,3225.79 2019.68,3210.04 2019.68,3206.1 2031.5,3194.29 2031.5,3154.92 2043.31,3143.11 2043.31,3091.93 2051.18,3084.06 2055.12,3084.06 v1(2118.11,3021.06)
USB_DN_EXT: J102.A7 J102.B7 U100.1 | length 546.3
  Top Layer w8.66: U100.1@1994.09,2990.16 2017.72,2990.16 2033.46,3005.91 2033.46,3041.96 2116.14,3124.63 J102.A7@2116.14,3140.94 2116.14,3174.41 v1(2096.46,3174.41) ; J102.B7@2145.67,3207.87 2145.67,3228.35 v1(2169.29,3251.97)
  Bottom Layer w8.66: v1(2096.46,3174.41) 2055.74,3174.41 2055.74,3216.54 2102.36,3216.54 2118.11,3200.79 v1(2169.29,3251.97)
USB_DP_EXT: J102.A6 J102.B6 U100.3 | length 639.7
  Top Layer w8.66: U100.3@1994.09,2915.35 2035.43,2915.35 2049.21,2929.13 2049.21,3035.43 2135.83,3122.05 J102.A6@2135.83,3140.94 2135.83,3174.41 v1(2155.51,3174.41) ; J102.B6@2125.98,3207.87 v1(2125.98,3250)
  Bottom Layer w8.66: v1(2125.98,3250) 2125.98,3263.78 2145.67,3283.46 2185.04,3283.46 2204.72,3263.78 2204.72,3194.09 2185.04,3174.41 v1(2155.51,3174.41)
USB_VBUS: J102.A4 J102.A9 J102.B4 J102.B9 R102.1 U100.5 | length 1098.1
  Top Layer w7.87: v1@2064.96,3105.51 2064.96,3109.45 2072.83,3117.32 2072.83,3121.26 2076.77,3125.2 J102.A9@2076.77,3140.94 ; v1(2064.96,3106.3) 2076.77,3118.11 2076.77,3141.73 J102.A9@2076.77,3140.94 ; R102.1@2076.18,2856.35 2076.18,2883.97 2064.89,2895.26 2064.89,2952.76 U100.5@2096.46,2952.76 2108.27,2964.57 2120.08,2964.57 2124.02,2968.5 v1(2167.32,2968.5) ; J102.B4@2086.61,3207.87 2084.65,3207.87 2084.65,3231.5 2080.71,3231.5 2076.77,3235.43 2072.83,3235.43 2045.28,3262.99 2041.34,3262.99 2037.4,3266.93 2017.72,3266.93 2013.78,3262.99 2009.84,3262.99 2005.91,3259.06 2005.91,3251.18 2001.97,3247.24 2001.97,3227.56 2005.91,3223.62 2005.91,3211.81 2009.84,3207.87 2009.84,3184.25 2013.78,3184.25 2017.72,3180.31 2037.4,3180.31 2049.21,3168.5 2064.96,3168.5 2068.9,3164.57 2072.83,3164.57 2072.83,3160.63 2076.77,3156.69 J102.A9@2076.77,3140.94 ; J102.B9@2185.04,3207.87 2185.04,3173.22 2175.2,3163.37 J102.A4@2175.2,3140.94 2175.2,3160.63 2179.13,3164.57 2183.07,3164.57 2187.01,3168.5 2218.5,3168.5 v1(2222.44,3172.44)
  Bottom Layer w7.87: v1@2064.96,3105.51 2108.27,3148.82 2159.45,3148.82 2163.39,3152.76 2202.76,3152.76 v1(2222.44,3172.44) ; v1(2064.96,3106.3) 2163.39,3007.87 2163.39,2972.44 v1(2167.32,2968.5)
USB_VBUS_OK: J100.24 U101.4 | length 1752.5
  Top Layer w7.87: v1(462.2,2385.83) 470.08,2377.95 J100.24@493.7,2377.95 ; v1(2056.69,2570.87) 2088.19,2602.36 U101.4@2087.6,2600.39
  Bottom Layer w7.87: v1(462.2,2385.83) 474.02,2385.83 481.89,2393.7 485.83,2393.7 501.57,2409.45 505.51,2409.45 513.39,2417.32 1714.17,2417.32 1729.92,2433.07 1887.4,2433.07 1891.34,2437.01 1895.28,2437.01 1914.96,2456.69 1918.9,2456.69 1938.58,2476.38 1942.52,2476.38 1946.46,2480.31 1950.39,2480.31 1981.89,2511.81 1985.83,2511.81 2005.51,2531.5 2009.45,2531.5 2017.32,2539.37 2021.26,2539.37 2044.88,2562.99 2048.82,2562.99 v1(2056.69,2570.87)
USB_VS_IN: R102.2 R103.1 U101.2 | length 440.5
  Top Layer w7.87: U101.2@1977.36,2637.8 2008.93,2637.8 2008.93,2646.87 2059.6,2697.55 2136.42,2697.55 ; R102.2@2136.42,2856.35 2136.42,2828.72 2136.42,2697.55 ; R103.1@2224.41,2686.42 2196.78,2686.42 2185.65,2697.55 2136.42,2697.55
VDARK: U500.3 U501.2 U501.6 | length 929.9
  Bottom Layer w7.87: U500.3@419.09,891.14 403.35,906.89 383.66,906.89 360.04,930.51 360.04,997.44 348.23,1009.25 348.23,1402.95 387.6,1442.32 387.6,1446.26 391.54,1450.2 391.54,1465.94 399.41,1473.82 399.41,1477.76 407.28,1485.63 426.97,1485.63 450.59,1509.25 U501.2@451.38,1510.43 547.96,1510.43 597.96,1560.43 U501.6@646.26,1560.43
VDARK_DIV: C502.1 R501.2 R502.1 U501.3 | length 476.2
  Bottom Layer w7.87: C502.1@303.15,1336.61 264.7,1336.61 238.78,1362.53 225.98,1362.53 R501.2@225.98,1387.2 225.98,1411.88 238.32,1411.88 289.38,1462.94 289.38,1519.76 310.5,1540.88 322.83,1540.88 R502.1@322.83,1565.55 397.96,1565.55 403.08,1560.43 U501.3@451.38,1560.43
VHI: R1100.2 R1101.1 U1101.5 U1101.9 U1102.5 | length 3728
  Top Layer w7.87: v1(2995.08,1770.47) 3093.5,1770.47 v1(3121.06,1798.03) ; v1(3329.72,1061.81) 3337.6,1061.81 3345.47,1069.68 3376.97,1069.68 3380.91,1073.62 3455.71,1073.62 3475.39,1093.31 3483.27,1093.31 v1(3506.89,1116.93)
  GND L3 w7.87: v1(2798.23,1490.94) v1(2869.09,1561.81) ; v1(3121.06,1798.03) 3152.56,1829.53 3156.5,1829.53 3160.43,1833.46 3164.37,1833.46 3168.31,1837.4 3203.74,1837.4 3207.68,1833.46 3211.61,1833.46 3522.64,1522.44 3621.06,1522.44 3625,1518.5 3628.94,1518.5 3640.75,1506.69 3640.75,1498.82 3644.68,1494.88 3644.68,1471.26 3640.75,1467.32 3640.75,1463.39 3506.89,1329.53 v1(3506.89,1116.93) ; v1@3199.8,1372.83 3203.74,1372.83 3239.17,1337.4 3239.17,1152.36 v1(3329.72,1061.81)
  Bottom Layer w5.91: U1102.5@3091.54,1309.84 v1(3201.77,1372.83)
  Bottom Layer w7.87: U1101.5@2422.24,1191.73 2492.38,1191.73 2542.38,1241.73 U1101.9@2617.13,1241.73 2526.57,1241.73 2518.7,1249.61 2518.7,1253.54 2514.76,1257.48 2514.76,1277.17 2522.64,1285.04 2522.64,1288.98 2613.19,1379.53 2707.68,1379.53 2711.61,1383.46 2715.55,1383.46 ; v1(2798.23,1490.94) 2798.23,1483.07 2754.92,1439.76 2754.92,1424.02 2715.55,1384.65 2715.55,1383.46 ; R1101.1@2852.36,1723.03 2852.36,1698.36 2840.02,1698.36 2823.82,1682.15 2823.82,1661.02 2817.32,1654.52 2735.93,1654.52 2726.22,1644.81 2726.22,1559.58 2742.43,1543.37 2747.83,1543.37 R1100.2@2747.83,1515.75 2747.05,1517.32 2715.55,1485.83 2715.55,1383.46 ; v1(2869.09,1561.81) 2880.91,1573.62 2880.91,1620.87 2908.46,1648.43 2908.46,1695.67 2904.53,1699.61 2904.53,1707.48 2896.65,1715.35 2896.65,1766.54 2951.77,1766.54 2955.71,1770.47 v1(2995.08,1770.47) ; U1102.5@3091.54,1309.84 3089.57,1309.84 3125,1309.84 3148.62,1333.46 3152.56,1333.46 3156.5,1337.4 3164.37,1337.4 v1@3199.8,1372.83
VIN_DC: C220.1 C221.1 F220.2 U220.2 | length 1270.3
  Top Layer w7.87: U220.2@3446.46,2283.46 3512.73,2217.19 3512.73,1929.13 F220.2@3561.22,1929.13
  Top Layer w31.5: v4(3475.39,1791.34) 3514.76,1830.71 v1(3518.7,1830.71) ; v1(3502.95,1885.83) 3506.89,1885.83 3534.45,1913.39 3546.26,1913.39 3562.01,1929.13 F220.2@3561.22,1929.13 3584.84,1952.76 3584.84,1956.69 3600.59,1972.44 v1(3620.28,1972.44) ; v1(3742.32,1822.83) 3754.13,1822.83 3758.07,1826.77 3762.01,1826.77 3765.94,1830.71 3765.94,1834.65 3781.69,1850.39 3781.5,1850.39 v4(3768.97,1862.92)
  GND L3 w31.5: v1(3502.95,1885.83) 3502.95,1874.02 3510.83,1866.14 3510.83,1838.58 v1(3518.7,1830.71) ; v1(3620.28,1972.44) 3742.32,1850.39 v1(3742.32,1822.83)
  Bottom Layer w31.5: v4(3475.39,1791.34) 3475.39,1830.71 C220.1@3514.76,1870.08 ; C221.1@3742.13,2047.24 3742.13,1889.76 v4(3768.97,1862.92)
VIN_N: C212.1 D202.2 D203.2 D211.2 U211.2 | length 2122.7
  Top Layer w31.5: U211.2@4470.08,1889.76 4470.08,1686.18 4550.26,1606 4550.26,1540.81 4520.22,1510.78 4520.22,1356.74 C212.1@4606.3,1270.67 ; v1(4481.31,2866.14) D203.2@4414.38,2799.21 4434.07,2779.53 4434.07,2775.59 4453.75,2755.91 4453.75,2751.97 4473.44,2732.28 4473.44,2728.35 4485.25,2716.54 4485.25,2704.72 4504.93,2685.04 4504.93,2681.1 4508.87,2677.17 4508.87,2602.36 4512.81,2598.43 4512.81,2590.55 4516.74,2586.61 4516.74,2582.68 4520.68,2578.74 4520.68,2492.13 4524.62,2488.19 4524.62,2468.5 4528.56,2464.57 4528.56,2452.76 4532.49,2448.82 4532.49,2444.88 4540.37,2437.01 4540.37,2433.07 4626.98,2346.46 4626.98,2330.71 4630.92,2326.77 4630.92,2263.78 4626.98,2259.84 4626.98,2251.97 4623.04,2248.03 4623.04,2232.28 4615.17,2224.41 4615.17,2153.54 4591.55,2129.92 4591.55,2086.61 D211.2@4592.91,2086.61 ; v1(4630.92,2960.63) 4630.92,2976.38 4638.79,2984.25 4638.79,3027.56 D202.2@4639.76,3027.56
  GND L3 w31.5: U211.2@4470.08,1889.76 4470.08,1963.78 D211.2@4592.91,2086.61 ; v1(4481.31,2866.14) 4536.43,2921.26 4540.37,2921.26 4560.05,2940.94 4583.67,2940.94 4595.48,2952.76 4607.3,2952.76 4615.17,2960.63 v1(4630.92,2960.63)
VIN_P: C200.1 C201.1 C202.1 C210.1 D200.1 D201.1 D210.1 F220.1 Q200.2 R201.1 U200.2 U210.3 | length 4759.2
  Top Layer w31.5: F220.1@3367.91,1929.13 3428.22,1929.13 v2(3433.07,1929.13) ; R201.1@3379.33,2716.54 3379.33,2755.97 v2(3414.83,2791.47) 3450.33,2826.97 3450.33,2844.49 ; C201.1@3400.39,2875 3430.91,2844.49 3450.33,2844.49 ; U200.2@3576.48,2859.65 3515.75,2859.65 C202.1@3500.59,2844.49 3450.33,2844.49 ; v2(3877.15,2887.6) D200.1@3940.94,2887.6 ; D201.1@4078.74,2746.25 4145.74,2746.25 4192.91,2699.07 D210.1@4192.91,2480.31 4127.89,2480.31 4109.19,2461.61 4074.8,2461.61 4074.8,2460.63 4153.54,2539.37 v4(4165.35,2539.37) ; Q200.2@4277.17,3053.15 4316.6,3053.15 4317.66,3052.09 v2@4414.2,3052.09 ; v2(4414.2,3049.59) v2@4414.2,3052.09 ; C200.1@4511.42,3055.31 4436.55,3055.31 4433.33,3052.09 v2@4414.2,3052.09
  GND L3 w31.5: v2(3414.83,2791.47) 3414.83,2787.72 3791.29,2411.25 ; v2(3433.07,1929.13) 3433.07,2053.04 3791.29,2411.25 ; v2(3877.15,2887.6) 3870.24,2894.51 3810.36,2894.51 3789.01,2873.17 3789.01,2632.71 3860.35,2561.37 3860.35,2480.31 ; v2(4414.2,3049.59) 4312.48,2947.87 4312.48,2664.91 4192.91,2545.34 D210.1@4192.91,2480.31 3860.35,2480.31 ; 3791.29,2411.25 3860.35,2480.31
  Bottom Layer w31.5: v4(4165.35,2539.37) 4185.04,2539.37 4232.28,2492.13 4232.28,2493.11 C210.1@4307.09,2493.11 ; D210.1@4192.91,2480.31 4257.94,2480.31 4393.7,2344.56 4570.08,2344.56 U210.3@4570.08,2283.46
VLO: R1101.2 R1102.1 U1101.6 U1101.10 U1102.6 | length 3136.6
  Top Layer w5.91: v1(3030.51,908.27) 3030.51,927.95 3083.66,981.1 3089.57,981.1 3093.5,985.04 3097.44,985.04 3101.38,988.98 3101.38,990.94 3103.35,992.91 3103.35,1000.79 v1(3113.19,1010.63)
  Top Layer w7.87: v1@2363.19,1203.54 2371.06,1203.54 2382.87,1191.73 2386.81,1191.73 2453.74,1124.8 2457.68,1124.8 2461.61,1120.87 2512.8,1120.87 v1(2524.61,1109.06) ; v1(2962.2,1745.67) v1(3076.38,1745.67) ; v1(3076.38,1466.14) 3076.38,1540.94 v1(3080.31,1544.88)
  GND L3 w5.91: v1(2849.41,1252.76) 2849.41,1217.32 2882.87,1183.86 2882.87,1181.89 2886.81,1177.95 2886.81,1175.98 2888.78,1174.02 2888.78,1101.18 2890.75,1099.21 2890.75,1071.65 2999.02,963.39 2999.02,961.42 3000.98,959.45 3000.98,957.48 3002.95,955.51 3002.95,947.64 3008.86,941.73 3008.86,939.76 3010.83,939.76 3010.83,937.8 3012.8,937.8 3012.8,935.83 3014.76,935.83 3014.76,933.86 3016.73,933.86 3016.73,931.89 3018.7,931.89 3018.7,929.92 3020.67,929.92 3020.67,927.95 3022.64,925.98 3022.64,916.14 v1(3030.51,908.27) ; v1@3044.29,1378.74 3044.29,1341.34 3046.26,1339.37 3046.26,1337.4 3050.2,1333.46 3050.2,1073.62 v1(3113.19,1010.63)
  GND L3 w7.87: v1(2666.93,1682.48) 2666.93,1650.98 2670.87,1647.05 2670.87,1643.11 2674.8,1643.11 2678.74,1639.17 2808.66,1639.17 2820.47,1650.98 2840.16,1650.98 ; v1(2883.46,1690.35) 2855.91,1662.8 2851.97,1662.8 2840.16,1650.98 ; v1(2962.2,1745.67) 2950.39,1745.67 2938.58,1733.86 2934.65,1733.86 2914.96,1714.17 2911.02,1714.17 2891.34,1694.49 2887.4,1694.49 2867.72,1674.8 2863.78,1674.8 2840.16,1651.18 2840.16,1650.98 ; v1@3044.88,1379.53 3056.69,1391.34 3056.69,1411.02 3076.38,1430.71 v1(3076.38,1466.14) ; v1(3076.38,1745.67) 3076.38,1548.82 v1(3080.31,1544.88)
  Bottom Layer w5.91: v1(2363.19,1202.36) U1101.6@2422.24,1241.73 ; v1(2743.11,1183.86) U1101.10@2617.13,1191.73 2619.09,1189.76 2766.73,1189.76 2768.7,1191.73 2770.67,1191.73 2829.72,1250.79 2847.44,1250.79 v1(2849.41,1252.76) ; v1@3044.29,1378.74 3052.17,1370.87 3058.07,1370.87 3069.88,1359.06 3091.54,1359.06 U1102.6@3091.54,1359.84 v1(3044.29,1379.53)
  Bottom Layer w7.87: v1@2363.19,1203.54 2390.75,1231.1 2410.43,1231.1 2422.24,1242.91 U1101.6@2422.24,1241.73 ; v1(2524.61,1109.06) 2524.61,1116.93 2516.73,1124.8 2516.73,1148.43 2520.67,1152.36 2520.67,1156.3 2524.61,1156.3 2528.54,1160.24 2563.98,1160.24 2567.91,1164.17 2591.54,1164.17 2619.09,1191.73 U1101.10@2617.13,1191.73 ; v1(2666.93,1682.48) 2678.74,1694.29 2678.74,1702.17 2698.43,1721.85 2698.43,1796.65 2694.49,1800.59 2694.49,1804.53 2686.61,1812.4 2686.61,1820.28 2666.93,1839.96 R1102.1@2666.93,1841.14 ; R1101.2@2852.36,1662.8 2851.97,1662.8 2879.53,1690.35 v1(2883.46,1690.35) ; v1(3044.29,1379.53) v1@3044.88,1379.53
VMID_DAC: R700.1 R800.1 R900.1 TP601.1 U601.2 U601.6 | length 3480.6
  Top Layer w5.91: v1(2781.3,1078.74) 2871.85,988.19 2871.85,984.25 2891.54,964.57 2891.54,960.63 2903.35,948.82 2903.35,940.94 2915.16,929.13 2915.16,925.2 2926.97,913.39 2926.97,909.45 2934.84,901.57 2934.84,877.95 2938.78,874.02 2938.78,870.08 2946.65,862.2 2958.46,862.2 v1(2966.34,854.33) ; v1(2887.6,389.76) 2887.6,397.64 2923.03,433.07 2923.03,669.29 v1(2966.34,712.6)
  Top Layer w7.87: TP601.1@2283.46,1653.54 2287.63,1649.38 v1(2447.51,1649.38) ; v1(2453.54,1736.22) 2477.17,1736.22 2481.1,1740.16 2630.71,1740.16 2650.39,1720.47 2666.14,1720.47 2685.83,1700.79 2697.64,1700.79 v1(2870.87,1527.56) ; v1(2733.07,1303.15) 2744.88,1291.34 2744.88,1287.4 2819.68,1212.6 2827.56,1212.6 2831.5,1208.66 2835.43,1208.66 2839.37,1204.72 2839.37,1196.85 2843.31,1192.91 2843.31,1094.49 2847.24,1090.55 2847.24,1086.61 2862.99,1070.87 2862.99,1059.06 2870.87,1051.18 2870.87,1047.24 v1(2902.36,1015.75)
  GND L3 w5.91: v1(2781.3,1078.74) 2781.3,929.13 v1(2785.24,925.2) ; v1(2966.34,712.6) 2966.34,728.35 2934.84,759.84 2934.84,763.78 2930.91,767.72 2930.91,787.4 2926.97,791.34 2926.97,814.96 v1(2966.34,854.33)
  GND L3 w7.87: v1(2634.65,1653.54) 2634.65,1610.24 2638.58,1606.3 2638.58,1551.18 2658.27,1531.5 2658.27,1393.7 2666.14,1385.83 2666.14,1381.89 2685.83,1362.2 2685.83,1358.27 2705.51,1338.58 2705.51,1334.65 2725.2,1314.96 2725.2,1311.02 v1(2733.07,1303.15)
  Bottom Layer w5.91: v1(2785.24,925.2) 2789.17,929.13 2789.17,933.07 2812.8,956.69 2812.8,960.63 2844.29,992.13 2844.29,996.06 2848.23,1000 2848.23,1019.68 R800.1@2871.85,1043.31 ; v1(2887.6,389.76) 2903.35,374.02 R900.1@2921.06,374.02
  Bottom Layer w7.87: U601.2@2195.67,1660.04 2243.96,1660.04 2265.69,1638.31 2436.44,1638.31 v1(2447.51,1649.38) 2438.85,1658.04 2438.85,1710.04 U601.6@2390.55,1710.04 ; v1(2453.54,1736.22) 2425.98,1708.66 U601.6@2390.55,1708.66 ; v1(2634.65,1653.54) 2634.65,1673.23 2630.71,1677.17 2630.71,1696.85 2626.77,1700.79 2536.22,1700.79 2528.35,1708.66 2528.35,1716.54 2512.6,1732.28 2508.66,1732.28 2504.72,1736.22 2492.91,1736.22 2488.98,1740.16 2481.1,1740.16 2477.17,1736.22 2465.35,1736.22 2461.42,1732.28 2457.48,1732.28 2433.86,1708.66 U601.6@2390.55,1708.66 ; v1(2870.87,1527.56) 2902.36,1496.06 R700.1@2901.38,1496.06 ; R800.1@2871.85,1043.31 2870.87,1043.31 2898.43,1015.75 v1(2902.36,1015.75) ; U601.6@2390.55,1708.66 U601.6@2390.55,1710.04 ; U601.6@2390.55,1708.66 U601.6@2390.55,1710.04
VRAIL: R1103.2 R1104.1 U1102.8 U1102.11 | length 1735.3
  Top Layer w7.87: v1(2636.81,895.67) 2656.5,915.35 2656.5,958.66 2672.24,974.41 2672.24,986.22 2687.99,1001.97 2687.99,1005.91 2719.49,1037.4 2719.49,1041.34 2727.36,1049.21 2727.36,1092.52 2731.3,1096.46 2735.24,1096.46 2739.17,1100.39 2774.61,1100.39 2778.54,1104.33 2786.42,1104.33 2790.35,1100.39 2794.29,1100.39 2806.1,1088.58 2806.1,1076.77 2908.46,974.41 2987.2,974.41 2991.14,970.47 2995.08,970.47 3006.89,958.66 3034.45,958.66 3038.39,962.6 3042.32,962.6 3073.82,994.09 3081.69,994.09 3085.63,998.03 3089.57,998.03 3089.57,1049.21 3128.94,1088.58 3152.56,1088.58 3156.5,1092.52 3160.43,1092.52 3215.55,1147.64 3235.24,1147.64 3243.11,1155.51 3247.05,1155.51 3250.98,1159.45 3270.67,1159.45 3349.41,1238.19 3353.35,1238.19 v1@3361.22,1246.06 ; v3(2664.37,935.04) 2664.37,962.6 R1104.1@2676.18,974.41
  GND L3 w7.87: v1(3230.08,1424.26) 3362.78,1291.56 v1(3362.78,1245.17)
  Bottom Layer w7.87: R1103.2@2567.91,935.04 2636.81,935.04 ; v1(2636.81,895.67) 2636.81,935.04 ; v3(2664.37,935.04) 2636.81,935.04 ; v1(3230.08,1424.26) 3238.12,1416.22 3238.12,1409.84 U1102.8@3286.42,1409.84 ; v1@3361.22,1246.06 3353.35,1246.06 3349.41,1250 3345.47,1250 3333.66,1261.81 3286.42,1261.81 U1102.11@3286.42,1259.84 3334.71,1259.84 3349.38,1245.17 v1(3362.78,1245.17)
WD_C1: C1000.2 U1000.14 | length 735.8
  GND L3 w7.87: v1(2747.54,1151.18) 2810.2,1088.52 2810.2,834.93 v1(2966.92,678.21)
  Bottom Layer w7.87: C1000.2@2700.39,1151.18 v1(2747.54,1151.18) ; v1(2966.92,678.21) 3036.09,678.21 3041.27,673.03 U1000.14@3089.57,673.03
WD_C2: C1001.2 U1000.6 | length 411.3
  Top Layer w5.91: v1(2751.08,1019.88) 2751.08,1017.91 2823.92,945.08 2823.92,929.33 v1(2949.9,803.35)
  Bottom Layer w5.91: C1001.2@2703.84,1015.75 2703.84,1015.94 2707.78,1019.88 v1(2751.08,1019.88) ; U1000.6@2894.68,823.03 2894.78,823.03 2916.44,823.03 2928.25,811.22 2942.03,811.22 v1(2949.9,803.35)
WD_CM5: U1000.5 U1001.3 | length 543
  GND L3 w7.87: v1(2782.98,496.63) 2877.28,590.94 2969.42,590.94 2994.33,615.85 2994.33,734.14 v1(2955.44,773.03)
  Bottom Layer w7.87: v1(2782.98,496.63) 2791.27,504.93 2791.27,509.84 U1001.3@2822.83,509.84 ; U1000.5@2894.68,773.03 v1(2955.44,773.03)
WD_MCU: U1000.13 U1001.1 | length 696.2
  GND L3 w7.87: v1(3074.89,412.24) 3142.22,479.57 v1(3142.22,745.98)
  Bottom Layer w7.87: U1001.1@2822.83,435.04 2854.4,435.04 2877.19,412.24 v1(3074.89,412.24) ; U1000.13@3089.57,723.03 3137.86,723.03 3137.86,741.63 v1(3142.22,745.98)
WD_R1: C1000.1 R1000.2 U1000.15 | length 1138.3
  Top Layer w7.87: R1000.2@2656.3,1297.44 2712.6,1241.14 v1(2747.64,1241.14)
  GND L3 w7.87: v1(2747.64,1241.14) 2720.08,1213.58 2720.08,1166.34 2724.02,1162.4 2724.02,1138.78 2727.95,1134.84 2727.95,1004.92 2759.45,973.43 2759.45,878.94 2763.39,875 2763.39,867.13 2767.32,863.19 2767.32,851.38 2877.56,741.14 2877.56,737.2 2916.93,697.83 2916.93,693.9 2948.43,662.4 2948.43,658.46 2972.05,634.84 v1@2972.05,626.97
  Bottom Layer w7.87: C1000.1@2700.39,1225.98 2700.39,1225.39 2716.14,1241.14 v1(2747.64,1241.14) ; v1(2971.74,625.89) 2974.59,623.03 U1000.15@3089.57,623.03 3090.16,623.03 3046.85,623.03 3042.91,626.97 v1@2972.05,626.97
WD_R2: C1001.1 R1001.2 U1000.7 | length 1218.1
  Top Layer w7.87: v1(2667.57,845.72) 2705.2,883.35 v1(2784.79,883.35) ; v1(2751.08,1077.76) 2751.08,1058.07 2770.77,1038.39 2770.77,1034.45 2774.71,1030.51 2774.71,1022.64 v1(2845.57,951.77)
  GND L3 w7.87: v1(2305.85,574.49) 2467.76,736.4 v1(2467.76,845.72)
  Bottom Layer w7.87: R1001.2@2211.81,596.17 2239.44,596.17 2261.12,574.49 v1(2305.85,574.49) ; v1(2467.76,845.72) v1(2667.57,845.72) ; C1001.1@2703.84,1090.55 2703.84,1089.57 2715.65,1077.76 v1(2751.08,1077.76) ; v1(2784.79,883.35) 2836.07,883.35 2846.39,873.03 U1000.7@2894.68,873.03 2892.82,873.03 2877.07,888.78 2857.38,888.78 2845.57,900.59 v1(2845.57,951.77)